# Altium PCB Board3ph.PcbDoc (part 4 of 4)
Units mil, origin at the board's own origin, x right, y up, seen from the top; angles counter-clockwise.
Board outline 2522.05 x 3126.78 mil, 4 copper layers (Top Layer, Mid Layer, Mid Layer 2, Bottom Layer), stack 61.653 mil thick; 132 components, 105 nets, 468 pads, 161 vias.
Unrouted connection lines stored in the file: 3.
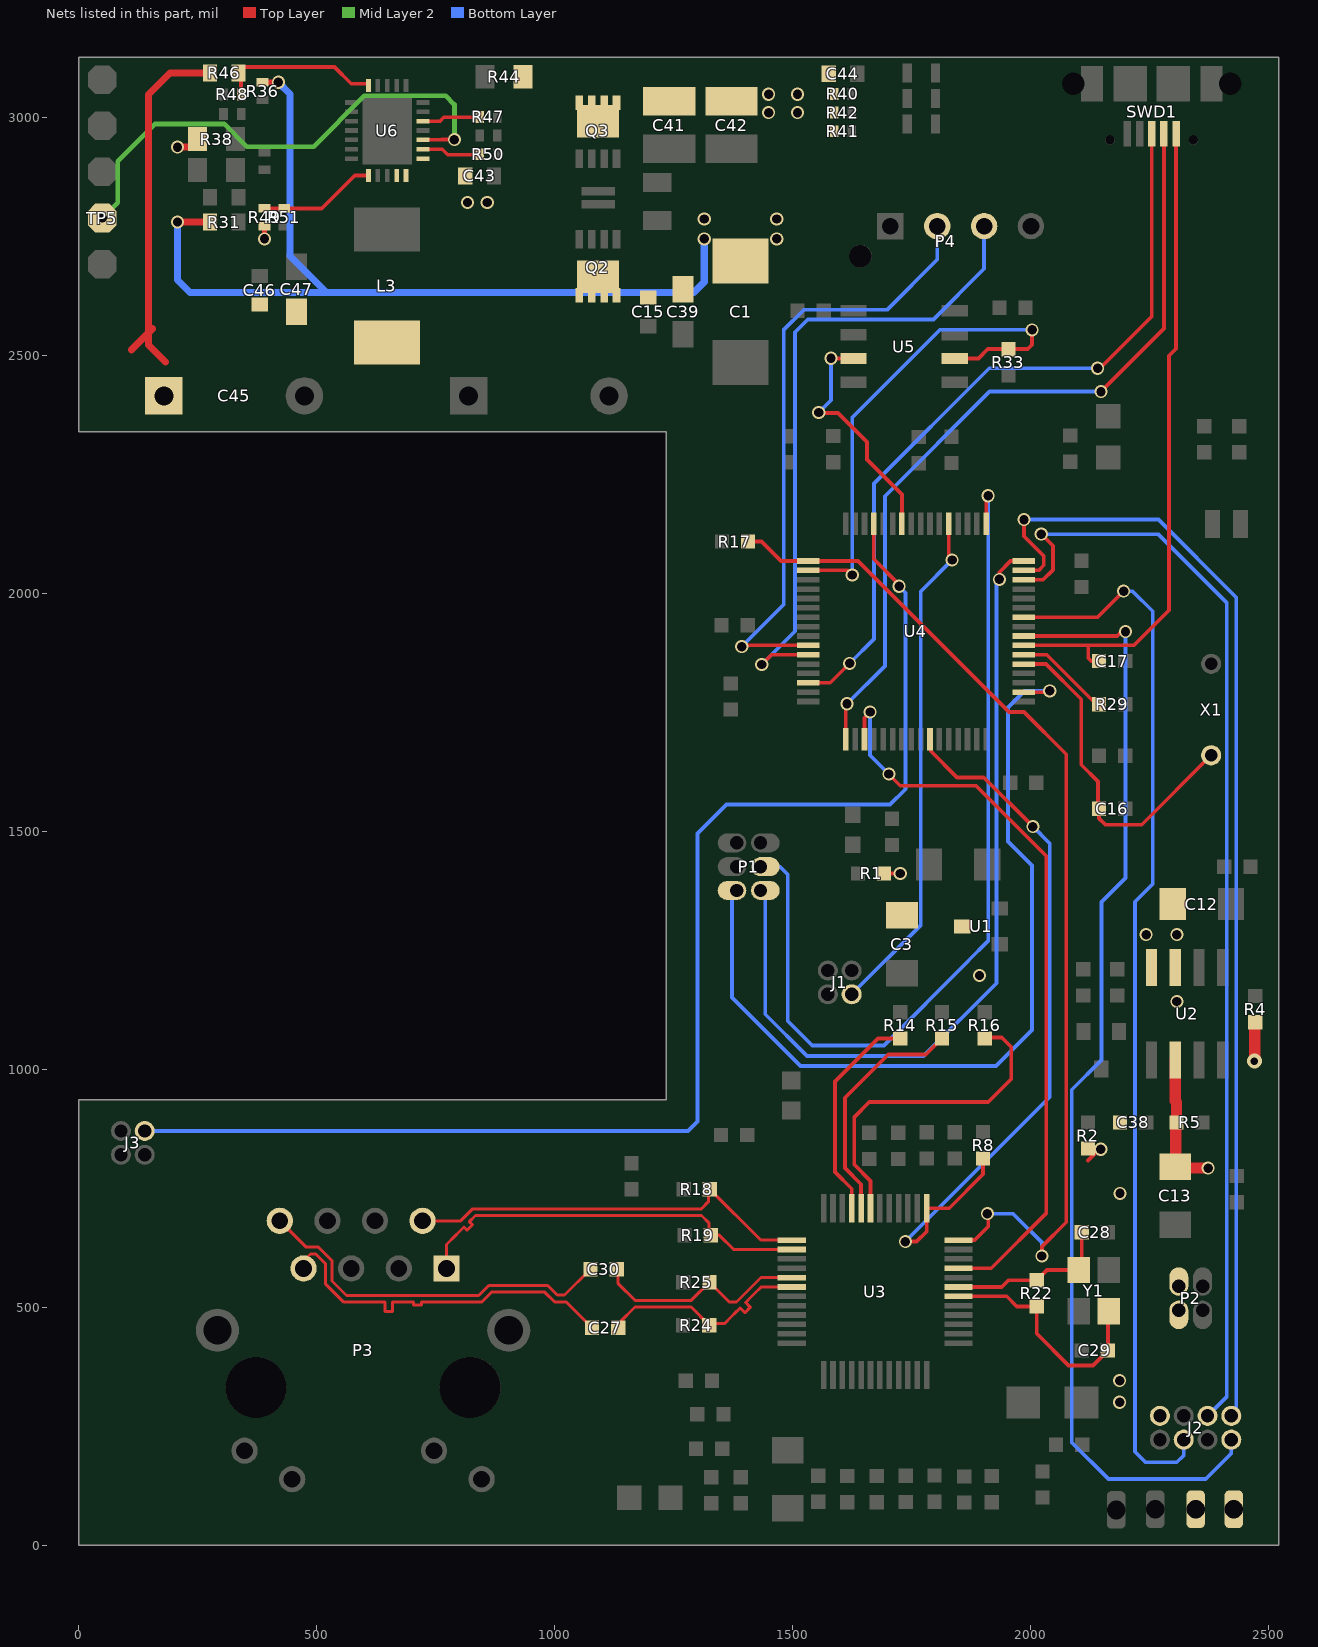
[diagram p5: the nets of this part, all layers, seen from the top]

## Via types
v1: diameter 27.56, hole 19.68, Top Layer to Bottom Layer, 151 vias
v2: diameter 23.62, hole 11.81, Top Layer to Bottom Layer, 6 vias
v3: diameter 27.56, hole 19.68, Top Layer to Bottom Layer, tented both sides, 2 vias
v4: diameter 21.65, hole 11.81, Top Layer to Bottom Layer, 1 vias
v5: diameter 31.5, hole 15.75, Top Layer to Bottom Layer, 1 vias

## Nets (pads, with @x,y where several pads share a name; then routed paths per layer and width w, separated by ;. In a path a pad name is that pad's centre, name@x,y a point inside that pad or via, vN(x,y) a via of type N, cw(c..) or ccw(c..) an arc to the next point about the centre after c; other vN are vias at no path point) (continued)
NetR46_1: R46.1 R48.2 U6.12 | length 347.6
  Top Layer w8: R48.2@341.5,3048.36 341.5,3088 R46.1@336,3093.5 336,3094.92 347,3105.92 537.61,3105.92 572.87,3070.67 609.25,3070.67 U6.12@609.25,3077
NetR47_2: R47.2 U6.5 | length 123
  Top Layer w7.87: U6.5@723.42,2992.2 759.3,2992.2 767.43,3000.32 841.66,3000.32 R47.2@842.66,3001.32
NetR49_2: R49.2 R51.1 U6.20 | length 247.2
  Top Layer w8: R49.2@390.71,2808.79 R51.1@432.24,2808.79 511.08,2808.79 580.31,2878.02 U6.20@609.25,2878.02
NetR50_2: R50.2 U6.2 | length 126.1
  Top Layer w7.87: U6.2@723.42,2933.14 764.29,2933.14 775.8,2921.63 837.6,2921.63 R50.2@842.66,2926.69
NetSWD1_2: SWD1.2 U4.49 | length 1676.7
  Top Layer w7.87: U4.49@1611.81,1694.09 v1@1611.81,1760.63 ; v1(2148.04,2424.02) 2280.32,2556.3 SWD1.2@2280.32,2965.55
  Bottom Layer w7.87: v1(1614.57,1768.11) 1694.09,1847.64 1694.09,2203.94 1914.17,2424.02 v1(2148.04,2424.02)
NetSWD1_3: SWD1.3 U4.46 | length 1616.4
  Top Layer w7.87: U4.46@1533.07,1812.2 1579.13,1812.2 v1(1620.08,1853.15) ; v1(2140.94,2473) 2141.94,2472 2144.84,2472 2254.73,2581.89 SWD1.3@2254.73,2965.55
  Bottom Layer w7.87: v1(1620.08,1853.15) 1671.26,1904.33 1671.26,2231.1 1913.16,2473 v1(2140.94,2473)
NetTP5_1: TP5.1 U6.3 | length 1110.1
  Top Layer w7.87: U6.3@723.42,2952.83 723.75,2953.16 789.39,2953.16 v1(789.73,2953.49) 763.86,2953.49
  Mid Layer 2 w10: v1(50,2788.69) 82.35,2821.05 82.35,2907.81 160.87,2986.33 305.67,2986.33 353.47,2938.53 493.73,2938.53 600.56,3045.36 771.53,3045.36 789.73,3027.17 v1(789.73,2953.49)
OE: J2.6 U4.10 | length 2249.2
  Top Layer w7.87: U4.10@1985.82,1950 2140.94,1950 v1(2195.67,2004.72) v1@2195.67,1998.82
  Bottom Layer w7.87: v1(2195.67,2004.72) 2214.57,2004.72 2256.69,1962.6 2256.69,1389.6 2219.38,1352.28 2219.38,1292.85 2219.38,1273.28 2219.38,196.76 2241.73,174.41 2307.48,174.41 2321.97,188.9 J2.6@2321.97,222.09
PH0-OSC_IN: C16.2 U4.5 X1.2 | length 720
  Top Layer w7.87: U4.5@1985.82,1851.57 2032.68,1851.57 2106.69,1777.56 2106.69,1640.16 2141.73,1605.12 2141.73,1547.64 C16.2@2144.09,1547.64 2144.09,1527.41 2157.57,1513.94 2233.62,1513.94 X1.2@2379.53,1659.84
PH1-OSC_OUT: R29.1 U4.6 | length 195.5
  Top Layer w7.87: U4.6@1985.82,1871.26 2034.37,1871.26 R29.1@2138.31,1767.32
PIO0_7/INT_N: R17.1 U3.36 U4.33 | length 2199.2
  Top Layer w7.87: R17.1@1406.69,2109.06 1435.04,2109.06 1475.98,2068.11 U4.33@1533.07,2068.11 1637.46,2068.11 1954.78,1750.79 1986.44,1750.79 2075,1662.22 2075,678.94 2024.02,627.95 v1(2024.02,607.87) ; U3.36@1848.82,641.34 1883.07,641.34 1911.42,669.68 1911.42,694.88 v1(1909.45,696.85)
  Bottom Layer w7.87: v1(1909.45,696.85) 1963.39,696.85 2024.02,636.22 v1(2024.02,607.87)
PM0: J2.3 U4.14 | length 2329.6
  Top Layer w7.87: U4.14@1985.82,2028.74 2026.33,2028.74 2047.09,2049.51 2047.09,2100.1 v1(2022.63,2124.56)
  Bottom Layer w7.87: v1(2022.63,2124.56) 2267.96,2124.56 2412.6,1979.92 2412.6,312.72 J2.3@2371.97,272.09
PM1: J2.1 U4.15 | length 2397.2
  Top Layer w7.87: U4.15@1985.82,2048.42 2017.32,2048.42 2028.07,2059.17 2028.07,2078.54 1986.44,2120.16 v1(1986.44,2155.11)
  Bottom Layer w7.87: v1(1986.44,2155.11) 2268.7,2155.11 2432.28,1991.53 2432.28,1961.2 2432.28,282.4 J2.1@2421.97,272.09
PMODE0: R14.1 U3.45 | length 455.2
  Top Layer w7.87: U3.45@1624.41,708.27 1624.41,749.35 1589.37,784.39 1589.37,974.41 1679.92,1064.96 R14.1@1726.38,1064.96
PMODE1: R15.1 U3.44 | length 503.5
  Top Layer w7.87: U3.44@1644.09,708.27 1644.09,758.74 1610.12,792.71 1610.12,940.44 1701.18,1031.49 1780.12,1031.49 1814.17,1065.55 R15.1@1814.17,1066.93
POMDE2: R16.1 U3.43 | length 702.3
  Top Layer w7.87: U3.43@1663.78,708.27 1663.78,765.65 1629.96,799.46 1629.96,900.19 1661.26,931.49 1911.42,931.49 1959.45,979.53 1959.45,1047.24 1939.76,1066.93 1905.9,1066.93 R16.1@1904.23,1065.25 ; R16.1@1903.94,1064.96 R16.1@1904.23,1065.25 ; R16.1@1903.94,1066.93 1903.94,1065.55 R16.1@1904.23,1065.25
RESET: J3.4 U4.29 | length 2836
  Top Layer w7.87: U4.29@1670.86,2146.85 1670.86,2072.05 1724.02,2018.9 v1(1724.02,2014.96)
  Bottom Layer w7.87: J3.4@139.06,870.63 1280.55,870.63 1300.63,890.71 1300.63,1495.71 1361.22,1556.3 1705.12,1556.3 1737.4,1588.58 1737.4,2001.57 v1(1724.02,2014.96)
RI: P1.2 U4.2 | length 1806.7
  Top Layer w7.87: U4.2@1985.82,1792.52 2037.8,1792.52 v1(2040.55,1795.27)
  Bottom Layer w7.87: P1.2@1382.87,1375.91 1372.87,1365.91 1372.87,1151.14 1516.93,1007.09 1927.56,1007.09 2003.15,1082.68 2003.15,1428.45 1952.89,1478.71 1952.89,1760.52 1987.64,1795.27 v1(2040.55,1795.27)
RLY1: J2.2 U4.8 | length 2390
  Top Layer w7.87: U4.8@1985.82,1910.63 2182.28,1910.63 2191.33,1919.68 v1(2199.6,1919.68)
  Mid Layer 2 w7.87: v1@2195.67,1919.68 v1(2199.6,1919.68)
  Bottom Layer w7.87: v1(2199.6,1919.68) 2199.6,1401.94 2149.23,1351.56 2149.23,1019.94 2086.65,957.36 2086.65,216.35 2163.63,139.37 2368.11,139.37 2421.97,193.23 J2.2@2421.97,222.09
RST: C17.2 SWD1.1 U4.7 | length 1395
  Top Layer w7.87: U4.7@1985.82,1890.94 2121.26,1890.94 ; C17.2@2144.09,1857.87 2127.56,1857.87 2121.26,1864.17 2121.26,1890.94 ; SWD1.1@2305.91,2965.55 2305.91,2514.24 2291.14,2499.47 2291.14,1964.76 2217.33,1890.94 2121.26,1890.94
RX2_N: C30.1 P3.R8 | length 782.5
  Top Layer w6.3: P3.R8@422.83,681.89 478.35,626.38 504.3,626.38 532.68,598 532.68,555.51 563.21,524.98 840.77,524.98 861.85,546.06 985.63,546.06 1005.91,525.79 1021.18,525.79 C30.1@1075.71,580.32
RX2_P: C27.1 P3.R7 | length 784.7
  Top Layer w6.3: P3.R7@472.83,581.89 472.83,597.64 487.4,612.2 498.43,612.2 518.5,592.13 518.5,549.64 553.18,514.96 557.34,510.81 573.62,510.81 619.68,510.81 627.76,510.81 643.9,510.81 643.9,491.12 660.04,491.12 660.04,510.81 676.18,510.81 679.92,510.81 687.99,510.81 704.13,510.81 704.13,505.33 720.28,505.33 720.28,510.81 735.43,510.81 846.64,510.81 850.79,514.96 867.72,531.89 979.76,531.89 1000.03,511.61 1024.33,511.61 C27.1@1078.86,457.09
RX_DEBG: P4.3 U4.43 | length 1387
  Top Layer w7.87: v1(1435.43,1850.79) 1455.91,1871.26 U4.43@1533.07,1871.26
  Bottom Layer w7.87: v1(1435.43,1850.79) 1505.07,1920.42 1505.07,2548.6 1532.13,2575.66 1796.04,2575.66 1902.51,2682.12 P4.3@1902.51,2783.65
RX_N: C30.2 R25.2 U3.5 | length 465.1
  Top Layer w6.3: C30.2@1130.71,580.32 1133.86,577.17 1133.86,549.8 1168.9,514.76 1287.48,514.76 R25.2@1325.47,552.76 1367.03,511.2 1382.5,511.2 1433.9,562.6 U3.5@1498.42,562.6
RX_P: C27.2 R24.2 U3.6 | length 464.4
  Top Layer w6.3: C27.2@1133.86,457.09 1137.01,460.24 1137.01,468.7 1168.9,500.59 1287.09,500.59 R24.2@1325.08,462.6 1328.23,465.75 1357.09,465.75 1373.03,481.69 1378.74,487.4 1390.15,498.81 1399.99,488.98 1411.4,500.39 1401.57,510.23 1412.98,521.64 1419.29,527.95 1434.25,542.91 U3.6@1498.42,542.91
RX_UC: P1.3 U4.17 | length 1900.4
  Top Layer w7.87: U4.17@1907.08,2146.85 1907.08,2201.18 v1(1911.02,2205.12)
  Bottom Layer w7.87: P1.3@1432.87,1425.91 1473.7,1425.91 1490.16,1409.45 1490.16,1101.57 1541.34,1050.39 1692.12,1050.39 1869.29,1227.56 1869.29,1228.23 1911.02,1269.96 v1(1911.02,2205.12)
SCAP: C45.1 C46.2 C47.1 L3.2 R46.2 U6.23 | length 787.3
  Top Layer w15: 111,2512 146.67,2547.67 ; 155,2556 146.67,2547.67 ; 182.5,2485.94 146.67,2521.77 146.67,2547.67 ; R46.2@276,3093.5 192.08,3093.5 146.67,3048.09 146.67,2547.67
SCLK: J1.3 U4.21 | length 1079.4
  Top Layer w7.87: U4.21@1828.34,2146.85 1828.34,2077.25 v1(1835.28,2070.32)
  Bottom Layer w7.87: J1.3@1624.25,1157.76 1769.69,1303.19 1769.69,2004.72 v1(1835.28,2070.32)
SCLK_EE: R33.1 U4.34 U5.6 | length 1087.5
  Top Layer w7.87: U4.34@1533.07,2048.42 1615.75,2048.42 v1(1625.59,2038.58) ; U5.6@1840.67,2493.7 1890.53,2493.7 1910.1,2513.27 R33.1@1953.66,2513.27 1994.06,2513.27 2003.34,2522.56 v1(2003.34,2553.72)
  Bottom Layer w7.87: v1(1625.59,2038.58) 1625.59,2369.8 1809.51,2553.72 v1(2003.34,2553.72)
SCLK_ETH: U3.33 U4.51 | length 1593.2
  Top Layer w7.87: U4.51@1651.18,1694.09 1651.18,1738.97 v1(1662.99,1750.79) ; v1(1702.36,1620.47) 1702.36,1620.08 1726.38,1596.06 1885.69,1596.06 2032.88,1448.87 2032.88,697.44 1917.71,582.28 U3.33@1848.82,582.28
  Bottom Layer w7.87: v1(1662.99,1750.79) 1662.99,1659.84 v1(1702.36,1620.47)
TX_DEBG: P4.2 U4.42 | length 1308.7
  Top Layer w7.87: v1(1393.31,1888.19) 1396.06,1890.94 U4.42@1533.07,1890.94
  Bottom Layer w7.87: v1(1393.31,1888.19) 1481.39,1976.27 1481.39,2553.31 1523.81,2595.74 1698.29,2595.74 1804.08,2701.52 P4.2@1804.08,2783.65
TX_N: P3.R2 R18.1 U3.1 | length 861.3
  Top Layer w6.3: P3.R2@722.83,681.89 802.79,681.89 827.99,707.09 1308.66,707.09 1323.23,721.65 1323.23,745.28 R18.1@1326.38,748.43 1433.46,641.34 U3.1@1498.42,641.34
TX_P: P3.R1 R19.1 U3.2 | length 861.3
  Top Layer w6.3: P3.R1@772.83,581.89 772.83,631.89 792.52,651.57 798.23,657.28 809.64,668.7 816.08,662.26 827.49,673.67 821.05,680.11 833.86,692.91 1308.66,692.91 1325.08,676.5 1325.08,654.72 R19.1@1328.23,651.57 1346.38,651.57 1376.3,621.65 U3.2@1498.42,621.65
TX_UC: P1.1 U4.16 | length 1776.7
  Top Layer w7.87: v1(1934.65,2029.53) 1934.65,2044.49 1958.27,2068.11 U4.16@1985.82,2068.11
  Bottom Layer w7.87: P1.1@1432.87,1375.91 1442.87,1365.91 1442.87,1115.79 1530.71,1027.95 1775.53,1027.95 1928.74,1181.16 1928.74,2023.62 v1(1934.65,2029.53)
VBAT: C13.2 P2.1 P2.2 pad.1 R4.1 R5.2 U2.6 | length 379
  Top Layer w23.62: U2.6@2304.13,1019.49 2304.13,933.97 2306.61,931.49 R5.2@2306.61,888.58 2305.37,887.34 2305.37,796.91 C13.2@2304.13,795.67 2306.95,792.85 2372.9,792.85 v1(2373.23,792.52) ; v5(2470.36,1017.32) 2471.4,1018.36 2471.4,1098.17 R4.1@2472.44,1099.21
VCC=5V: C1.1 C15.2 C38.1 C39.1 J2.7 pad.2 Q2.5 Q2.6 Q2.7 Q2.8 Q2.9 R1.1 R31.2 R36.2 U2.4 | length 1957.7
  Top Layer w7.87: R1.1@1692.46,1411.65 v1(1726.38,1411.65)
  Top Layer w12: R36.2@386.71,3074 v1(419.74,3074)
  Top Layer w15: v1(208,2780.29) R31.2@276,2780.29
  Bottom Layer w15: v1(208,2780.29) 208,2658.41 234.08,2632.33 521.24,2632.33 ; v1(419.74,3074) 444.57,3049.17 444.57,2709 521.24,2632.33 ; v1(1314.57,2745) 1314.57,2654.35 1292.55,2632.33 521.24,2632.33
  other v1: 2187.3,300.7 2187.3,346.06 2188.19,739.53 2243,1283.07 1467,2745 1314.57,2786.65 1467,2786.65
VSYS-5V: C3.1 C12.2 C41.2 C42.2 C43.2 C44.2 Q3.5 Q3.6 Q3.7 Q3.8 Q3.9 R2.2 R38.2 R40.2 R41.2 R42.2 R44.2 R49.1 U1.3 U2.3 U6.1 U6.24 | length 105.6
  Top Layer w7.87: 2120.76,808.38 2144.69,832.32 v1(2147.67,832.32)
  Top Layer w10: v1(390.71,2745) R49.1@390.71,2771.79
  Top Layer w15: v1(208,2937.67) R38.2@250,2937.67
  other v1: 1892.91,1197.24 817.08,2821.29 858.73,2821.29 1449.84,3010.13 1510.41,3010.13 1449.84,3048.74 1510.41,3048.74
  other v3: 2307.47,1142.52 2307.47,1283.07
W5500_RST: R8.1 U3.37 U4.58 | length 1602.6
  Top Layer w7.87: v1(1737.01,638.19) 1760.63,638.19 1781.89,659.45 U3.37@1781.89,708.27 1829.14,708.27 1900.39,779.53 R8.1@1900.39,812.99 ; U4.58@1788.97,1694.09 1790.94,1692.13 1790.94,1668.36 1845.92,1613.39 1901.77,1613.39 v1(2005.02,1510.14)
  Bottom Layer w7.87: v1(1737.01,638.19) 2040.55,941.73 2040.55,1474.61 v1(2005.02,1510.14)
W_EE: U4.26 U5.3 | length 500.6
  Top Layer w7.87: v1(1555.2,2380.1) 1556.06,2379.24 1595.67,2379.24 1656.57,2318.34 1656.57,2281.41 1729.92,2208.06 U4.26@1729.92,2146.85 ; v1(1581,2494) 1581.3,2493.7 U5.3@1628.07,2493.7
  Bottom Layer w7.87: v1(1555.2,2380.1) 1581,2405.9 v1(1581,2494)
XI: C29.2 R22.2 U3.30 Y1.3 | length 503.7
  Top Layer w7.87: U3.30@1848.82,523.23 1950,523.23 1971.14,502.09 R22.2@2013.39,502.09 2013.39,444.49 2079.92,377.95 2131.1,377.95 C29.2@2162.6,409.45 2162.6,490.15 Y1.3@2164.18,491.73
XO: C28.2 R22.1 U3.31 Y1.1 | length 349.2
  Top Layer w7.87: U3.31@1848.82,542.91 1939.76,542.91 1953.94,557.09 R22.1@2013.39,557.09 2034.65,578.35 Y1.1@2101.18,578.35 2107.48,584.65 C28.2@2107.48,657.87
pads on no net: J3.2 J3.3 P3. P3.R4 P3.R5 P3.R6 P4.5 SWD1.6 SWD1.7 SWD1.8 SWD1.9 SWD1.None U2.5 U3.7 U3.12 U3.13 U3.18 U3.24 U3.26 U3.46 U3.47 U4.25 U4.27 U4.30 U4.39 U4.44 U4.45 U4.50 U4.54 U4.55 U4.59 U4.61

## Polygon pours and split planes (outlines as drawn)
GND on Mid Layer "Mid Layer-GND" (solid, pour order 6): 2485,2712.99 2485,3108 23,3108 23,2363 1268.74,2363 1261.28,31.5 2485,31.5
NetC45_2 on Mid Layer 2 "NETC45_2_L03_P052" (solid, pour order 52): 121.56,2354 1075.24,2354 1075.27,2353.98 1075.27,3112 679.77,3112 679.77,3067.82 885.91,3067.82 919,3034.72 919,2691.95 121.56,2691.95
VSYS-5V on Mid Layer 2 "VSYS-5V_L03_P051" (solid, pour order 51): 183.63,2954.97 121.56,2892.9 121.56,2722 174.12,2722 174.25,2722.13 259.13,2722.13 259,2722 884.56,2722 885.91,2720.66 885.91,2859 324,2859 324,2904.2 273.23,2954.97
VSYS-5V on Mid Layer 2 "VSYS-5V_L03_P040" (solid, remove dead copper, pour order 40): 1108.68,2824.61 2291.14,2824.61 2291.14,1226.95 1873.21,1226.95 1873.21,1030.31 2086.62,1030.31 2086.62,811 2271.18,811 2271.18,1055 2494,1055 2494,3112 1108.68,3112
+3V3 on Mid Layer 2 "Mid Layer 2-+3.3V" (solid, pour order 14): 2001,181 2075.9,106.1 2210.63,106.1 2210.63,34.65 1739,34.65 1739,431.91 1264.12,906.79 1264.14,2383.46 2028.41,2383.46 2028.41,1505.53 1624.25,1505.53 1624.25,906.84 2001,530.09
VCC=5V on Mid Layer 2 "VCC=5V_L03_P041" (solid, remove dead copper, pour order 41): 2271.97,293.7 2291.14,293.7 2291.14,251.24 2251.21,251.24 2242.91,242.94 2242.91,190.14 2373.23,190.14 2373.23,38.97 2318.27,38.97 2318.27,128 2088,128 2024.02,191.98 2024.02,526.98 1638.62,912.38 1638.62,1492.76 2040.11,1492.76 2040.11,2415 1108,2415 1108,2809.08 2277,2809.08 2277,1240 1863.78,1240 1863.78,1017.32 2074.02,1017.32 2074.02,802 2271.97,802
VBAT on Mid Layer 2 "VBAT_L03_P021" (solid, pour order 21): 2495.28,464.1 2495.28,38 2406,38 2406,174.21 2452,174.21 2452,323 2285.43,323 2285.43,1043 2495.28,1043
+3V3A on Mid Layer 2 "Mid Layer 2-+3V3A" (solid, pour order 10): 1387.14,763 1726.16,423.99 1726.16,34.65 1200,34.65 1200,763
VSYS-5V on Top Layer "VSYS-5V_L01_P045" (solid, pour order 45): 1025.75,2957.75 1025.75,3016.71 981.96,3060.5 894.16,3060.5 894.16,3116.84 1596.4,3116.84 1596.4,2992.2 1169.6,2992.2 1135.15,2957.75
VSYS-5V on Top Layer "VSYS-5V_L01_P042" (solid, pour order 42): 827.71,2895.12 827.71,2849.77 841.54,2835.94 879.66,2835.94 879.66,2793 789.73,2793 789.73,2826.62 752.1,2864.24 683.07,2864.24 683.07,2891.8 706.31,2891.8 709.64,2895.12 709.64,2918.38 737.2,2918.38 760.45,2895.12
SCAP on Top Layer "SCAP_L01_P038" (solid, pour order 38): 658.92,2629.13 727.11,2629.13 735.26,2637.29 735.26,2808.37 726.09,2817.54 686.09,2817.54 660.22,2843.41 660.22,2894.71 677.36,2894.71 677.36,2861.2 681.06,2857.5 748.87,2857.5 779.99,2826.38 779.99,2788.13 779.99,2480.55 658.92,2480.55
NetL3_1 on Top Layer "NETL3_1_L01_P039" (solid, pour order 39): 615.13,2856 591.94,2856 527,2791.06 527,2691.79 724.4,2691.79 724.4,2811.07 681.41,2811.07 653.54,2838.94 653.54,2894.8 624.01,2894.8 624.01,2864.88
VCC=5V on Top Layer "VCC=5V_L01_P020" (solid, pour order 20): 2170.01,367 2170.01,263.72 2181.73,252 2295,252 2295,295.94 2311.26,312.2 2447.55,312.2 2462.09,297.66 2462.09,200 2447.4,185.31 2321.97,185.31 2306.61,169.96 2306.61,33.05 2371.97,33.05 2371.97,139.97 2488,139.97 2506,157.97 2506,336.12 2475.12,367
GND on Top Layer "Mid Layer-GND" (solid, remove dead copper, pour order 49): 2485,2712.99 2485,3116.84 35,3116.84 35,2353.37 1264.74,2353.37 1257.32,31.5 2480.31,31.5 2480.32,2712.99
GND on Top Layer "GND_L01_P046" (solid, pour order 46): 2496.85,734.65 2398.24,734.65 2266,734.65 2266,913.78 2217.33,913.78 2217.33,734.65 2217.33,676.5 2139.16,676.5 2137.8,544.1 2238.5,543.78 2238.5,607.87 2334.57,607.87 2340.81,601.63 2340.81,409.45 2496.85,409.45
VSYS-5V on Top Layer "VSYS-5V_L01_P048" (solid, remove dead copper, pour order 48): 1694.09,1353.29 1694.09,1262.99 1782.28,1262.99 1782.28,1177.56 1907.08,1177.56 1907.08,1315.39 1763.38,1315.39 1763.38,1353.29
VSYS-5V on Top Layer "VSYS-5V_L01_P047" (solid, remove dead copper, pour order 47): 2327,1380.41 2327,1119.96 2274,1119.96 2274,1380.41
VSYS-5V on Bottom Layer "VSYS-5V_L04_P050" (solid, pour order 50): 952.31,2864 951.66,2997.78 1019.46,3065.58 1555.2,3065.58 1555.2,2995 1108.89,2995 1062.69,2948.79 1062.69,2815.83 1038.86,2792 763,2792 763,2864
GND on Bottom Layer "Mid Layer-GND" (solid, remove dead copper, pour order 43): 2485,2712.99 2485,3117 25,3117 25,2354 1264.41,2354 1256.98,31.5 2480.31,31.5 2480.32,2712.99

## Other copper
Top Layer:
  rectangle net VSYS-5V: 1578.4,2958.43 1596.4,3116.58
  rectangle net NetC45_2: 283,2353.37 911.41,2469.66
  rectangle net SCAP: 95,2353.37 270,2629.13
  rectangle net SCAP: 95,2480.55 779.99,2629.13
  region net NetQ3_1: 1158.65,2882.43 1025.42,2882.43 1025.42,2836.02 1158.65,2836.02
  rectangle net NetQ3_1: 1025.42,2836.02 1112.27,2945.35
  rectangle net NetC40_2: 1025.75,2774.98 1245.83,2826.26
  rectangle net NetC40_2: 1070.34,2724 1245.83,2826.26
  rectangle net VCC=5V: 1025.75,2599.97 1449.84,2699.51
  rectangle net VCC=5V: 1331.73,2606.6 1449.84,2745.14
  rectangle net VCC=5V: 1291.19,2720.7 1484.85,2804
  rectangle net +3V3: 1961.66,1761.68 2021.98,1778.43
  rectangle net GND: 1218.11,31.5 1307.32,124.76
  rectangle net VCC=5V: 2170.18,721.07 2205.09,913.78
  rectangle net VSYS-5V: 2096.31,799.31 2160.24,851.93
  rectangle net VCC=5V: 2217.33,1175.56 2266,1300.39
  pour cut-out: 501.94,2842.16 501.94,2796.81 530.96,2796.81 530.96,2842.01 530.81,2842.16
  pour cut-out: 291.35,3115.7 291.35,3070.35 320.37,3070.35 320.37,3115.55 320.22,3115.7
  pour cut-out: 351.22,2802.79 351.22,2757.44 408.7,2757.44 408.7,2802.79
  pour cut-out: 1596.4,3067.74 1596.4,2952.52 1786.13,2952.52 1786.13,3067.74
  pour cut-out: 1147.6,2967.04 1147.6,2882.8 1176.62,2882.8 1176.62,2967.04
  pour cut-out: 971.66,2807.25 971.66,2680.94 1019.36,2680.94 1019.36,2807.25
  pour cut-out: 1291.19,2810 1245.83,2810 1245.83,2780.98 1291.04,2780.98 1291.19,2781.13
  pour cut-out: 1019.36,2798.69 982.03,2798.69 941.52,2839.2 941.52,2987.35 911.41,3017.46 857.56,3017.46 857.56,3055.35 981.5,3055.35 1019.36,3017.49
Mid Layer 2:
  region net VCC=5V: 2161.02,293.7 2286.22,293.7 2286.22,255.91 2284.65,254.33 2161.02,254.33
Bottom Layer:
  rectangle net VCC=5V: 1291.2,2720.77 1484.93,2804.06

## Silkscreen, mask and mechanical layers (free items; w line width, h text height)
Top Overlay:
  circle w7.87: c2266.43,838.97 r3.94
  circle w7.87: c2487.29,838.97 r3.94
  circle w7.87: c2064.57,623.62 r3.94
  lines w1: 2492.57,2284.56 2492.57,2367.56
  lines w5: 12.11,2643.96 215.38,2643.96 215.38,2543.89 115.43,2543.89 115.43,2451.43 96.5,2451.43 ; 218.73,2618.89 258,2618.89 258,2745 ; 229.36,2841.55 229.36,2745 365,2745 365,3114.32 ; 390.71,2821.29 390.71,2839.31 482.74,2839.31 482.74,2853 ; 407.71,2527.6 420.24,2527.6 420.24,2575.13 ; 793.71,2856.03 793.71,2841.55 901.68,2841.55 ; 830.16,3017.32 830.16,3032.36 901.68,3032.36 901.68,2856.03 901.68,2691.79 ; 834.48,2513.81 834.48,2691.79 901.68,2691.79 ; 940,2515 940,2691.79 901.68,2691.79 ; 2097,2742 2467.85,2742 2467.85,2810.72 2097,2810.72 2097,2742
  lines w10: 2145.07,30.94 2151.25,24.76 2485.19,24.76 2493.06,32.64 2493.06,123.19 2485.19,131.06 2155.19,131.06 2145.07,120.94 2145.07,30.94
  text "CAP-GD" at 1850.99,3076.95 h35
  text "CAP-GD" at 87,3062.77 h35
  text "SYS-GD" at 1848.47,3023.38 h35
  text "PFO" at 1848.47,2969.8 h35
  text "SYS-GD" at 87,2965.87 h35
  text "PFO" at 87,2868.97 h35
  text "IMON" at 87,2772.06 h35
  text "+3V3" at 2115.59,2761 h27.56
  text "TX" at 2239.79,2761 h27.56
  text "RX" at 2308.9,2761 h27.56
  text "GND" at 2379.53,2761 h27.56
  text "CAPFLT" at 87,2675.18 h35
  text "+" at 1750.12,1375.91 h27.56
  text "+" at 1671.26,1283.07 h27.56
  text "+5V" at 2394.88,53.94 h19.68 r90
  text "GND" at 2314.57,52.76 h19.68 r90
  text "VBAT" at 2480.07,40.94 h19.68 r90
  text "+3.3V" at 2232.68,32.28 h19.68 r90
Mechanical 1:
  the board outline again, w10
Mechanical 3:
  drawing of 295 lines, arcs and shapes, not listed
  text "Layer" at 2927.58,1418 h60
  text "Name" at 3337.49,1418 h60
  text "Material" at 4267.23,1418 h60
  text "Thickness" at 5127,1418 h60
  text "Constant" at 5776.84,1418 h60
  text "Board Layer Stack" at 6346.7,1418 h60
  text "Top Overlay" at 3337.49,1298 h60
  text "Top Solder" at 3337.49,1178 h60
  text "Solder Resist" at 4267.23,1178 h60
  text "0.010mm" at 5127,1178 h60
  text "3.5" at 5776.84,1178 h60
  text "1" at 2927.58,1058 h60
  text "Top Layer" at 3337.49,1058 h60
  text "0.035mm" at 5127,1058 h60
  text "Dielectric 1" at 3337.49,938 h60
  text "FR-4" at 4267.23,938 h60
  text "0.203mm" at 5127,938 h60
  text "4.2" at 5776.84,938 h60
  text "2" at 2927.58,818 h60
  text "Mid Layer" at 3337.49,818 h60
  text "0.030mm" at 5127,818 h60
  text "Dielectric 3" at 3337.49,698 h60
  text "1.030mm" at 5127,698 h60
  text "4.2" at 5776.84,698 h60
  text "3" at 2927.58,578 h60
  text "Mid Layer 2" at 3337.49,578 h60
  text "0.030mm" at 5127,578 h60
  text "Dielectric 2" at 3337.49,458 h60
  text "0.203mm" at 5127,458 h60
  text "4.2" at 5776.84,458 h60
  text "4" at 2927.58,338 h60
  text "Bottom Layer" at 3337.49,338 h60
  text "0.035mm" at 5127,338 h60
  text "Bottom Solder" at 3337.49,218 h60
  text "Solder Resist" at 4267.23,218 h60
  text "0.010mm" at 5127,218 h60
  text "3.5" at 5776.84,218 h60
  text "Bottom Overlay" at 3337.49,98 h60
  text "Total board thickness:" at 2927.58,-22 h60
  text "1.586mm" at 5127,-22 h60
Mechanical 4:
  circle w7.87: c2069.97,1163.78 r3.94
  circle w7.87: c2069.97,1163.78 r3.94
  circle w7.87: c2480.71,2188.58 r3.94
  circle w7.87: c2480.71,2188.58 r3.94
  circle w7.87: c2391.23,829.92 r3.94
  circle w7.87: c2391.23,829.92 r3.94
  circle w7.87: c2089.37,1164.57 r3.94
Board Outline:
  the board outline again, w10
Drill Drawing:
  drawing of 191 lines, arcs and shapes, not listed
  text "Symbol" at 3014.5,4224.94 h72
  text "Count" at 3520.38,4224.94 h72
  text "Hole Size" at 4120.22,4224.94 h72
  text "Plated" at 5269.88,4224.94 h72
  text "Hole Type" at 5775.76,4224.94 h72
  text "Drill Layer Pair" at 6509.56,4224.94 h72
  text "Via/Pad" at 8009.11,4224.94 h72
  text "Pad Shape" at 8598.96,4224.94 h72
  text "Template" at 9688.64,4224.94 h72
  text "Description" at 10678.36,4224.94 h72
  text "Hole Tolerance (+)" at 11532.12,4224.94 h72
  text "Hole Tolerance (-)" at 12865.73,4224.94 h72
  text "Hole Length" at 14199.33,4224.94 h72
  text "Routed Path Length" at 15289.02,4224.94 h72
  text "1" at 3520.38,4074.94 h60
  text "15.75mil (0.400mm)" at 4120.22,4074.94 h60
  text "PTH" at 5269.88,4074.94 h60
  text "Round" at 5775.76,4074.94 h60
  text "Top Layer - Bottom Layer" at 6509.56,4074.94 h60
  text "Via" at 8009.11,4074.94 h60
  text "Rounded" at 8598.96,4074.94 h60
  text "v80h40" at 9688.64,4074.94 h60
  text "-" at 14199.33,4074.94 h60
  text "-" at 15289.02,4074.94 h60
  text "1" at 3520.38,3924.94 h60
  text "47.00mil (1.194mm)" at 4120.22,3924.94 h60
  text "NPTH" at 5269.88,3924.94 h60
  text "Round" at 5775.76,3924.94 h60
  text "Top Layer - Bottom Layer" at 6509.56,3924.94 h60
  text "Pad" at 8009.11,3924.94 h60
  text "Rounded" at 8598.96,3924.94 h60
  text "c120hn119m135" at 9688.64,3924.94 h60
  text "-" at 14199.33,3924.94 h60
  text "-" at 15289.02,3924.94 h60
  text "2" at 3520.38,3774.94 h60
  text "19.69mil (0.500mm)" at 4120.22,3774.94 h60
  text "NPTH" at 5269.88,3774.94 h60
  text "Round" at 5775.76,3774.94 h60
  text "Top Layer - Bottom Layer" at 6509.56,3774.94 h60
  text "Pad" at 8009.11,3774.94 h60
  text "Rounded" at 8598.96,3774.94 h60
  text "c50hn50" at 9688.64,3774.94 h60
  text "-" at 14199.33,3774.94 h60
  text "-" at 15289.02,3774.94 h60
  text "2" at 3520.38,3624.94 h60
  text "19.69mil (0.500mm)" at 4120.22,3624.94 h60
  text "PTH" at 5269.88,3624.94 h60
  text "Round" at 5775.76,3624.94 h60
  text "Top Layer - Bottom Layer" at 6509.56,3624.94 h60
  text "Via" at 8009.11,3624.94 h60
  text "Rounded" at 8598.96,3624.94 h60
  text "v70h50m0mx0" at 9688.64,3624.94 h60
  text "-" at 14199.33,3624.94 h60
  text "-" at 15289.02,3624.94 h60
  text "2" at 3520.38,3474.94 h60
  text "26.77mil (0.680mm)" at 4120.22,3474.94 h60
  text "PTH" at 5269.88,3474.94 h60
  text "Round" at 5775.76,3474.94 h60
  text "Top Layer - Bottom Layer" at 6509.56,3474.94 h60
  text "Pad" at 8009.11,3474.94 h60
  text "Rounded" at 8598.96,3474.94 h60
  text "c108h68" at 9688.64,3474.94 h60
  text "-" at 14199.33,3474.94 h60
  text "-" at 15289.02,3474.94 h60
  text "2" at 3520.38,3324.94 h60
  text "47.24mil (1.200mm)" at 4120.22,3324.94 h60
  text "NPTH" at 5269.88,3324.94 h60
  text "Slot" at 5775.76,3324.94 h60
  text "Top Layer - Bottom Layer" at 6509.56,3324.94 h60
  text "Pad" at 8009.11,3324.94 h60
  text "Rectangle" at 8598.96,3324.94 h60
  text "r40_100hn120_50" at 9688.64,3324.94 h60
  text "19.69mil (0.500mm)" at 14199.33,3324.94 h60
  text "-27.56mil (-0.700mm)" at 15289.02,3324.94 h60
  text "2" at 3520.38,3174.94 h60
  text "59.06mil (1.500mm)" at 4120.22,3174.94 h60
  text "PTH" at 5269.88,3174.94 h60
  text "Round" at 5775.76,3174.94 h60
  text "Top Layer - Bottom Layer" at 6509.56,3174.94 h60
  text "Pad" at 8009.11,3174.94 h60
  text "Rounded" at 8598.96,3174.94 h60
  text "c230h150m230p0" at 9688.64,3174.94 h60
  text "-" at 14199.33,3174.94 h60
  text "-" at 15289.02,3174.94 h60
  text "2" at 3520.38,3024.94 h60
  text "127.95mil (3.250mm)" at 4120.22,3024.94 h60
  text "NPTH" at 5269.88,3024.94 h60
  text "Round" at 5775.76,3024.94 h60
  text "Top Layer - Bottom Layer" at 6509.56,3024.94 h60
  text "Pad" at 8009.11,3024.94 h60
  text "Rounded" at 8598.96,3024.94 h60
  text "c325hn325m325p0" at 9688.64,3024.94 h60
  text "-" at 14199.33,3024.94 h60
  text "-" at 15289.02,3024.94 h60
  text "4" at 3520.38,2874.94 h60
  text "35.00mil (0.889mm)" at 4120.22,2874.94 h60
  text "PTH" at 5269.88,2874.94 h60
  text "Round" at 5775.76,2874.94 h60
  text "Top Layer - Bottom Layer" at 6509.56,2874.94 h60
  text "Pad" at 8009.11,2874.94 h60
  text "(Mixed)" at 8598.96,2874.94 h60
  text "(Mixed)" at 9688.64,2874.94 h60
  text "-" at 14199.33,2874.94 h60
  text "-" at 15289.02,2874.94 h60
  text "4" at 3520.38,2724.94 h60
  text "39.37mil (1.000mm)" at 4120.22,2724.94 h60
  text "PTH" at 5269.88,2724.94 h60
  text "Round" at 5775.76,2724.94 h60
  text "Top Layer - Bottom Layer" at 6509.56,2724.94 h60
  text "Pad" at 8009.11,2724.94 h60
  text "Rounded Rectangle" at 8598.96,2724.94 h60
  text "r100_200h100r25" at 9688.64,2724.94 h60
  text "-" at 14199.33,2724.94 h60
  text "-" at 15289.02,2724.94 h60
  text "4" at 3520.38,2574.94 h60
  text "40.16mil (1.020mm)" at 4120.22,2574.94 h60
  text "PTH" at 5269.88,2574.94 h60
  text "Round" at 5775.76,2574.94 h60
  text "Top Layer - Bottom Layer" at 6509.56,2574.94 h60
  text "Pad" at 8009.11,2574.94 h60
  text "(Mixed)" at 8598.96,2574.94 h60
  text "(Mixed)" at 9688.64,2574.94 h60
  text "-" at 14199.33,2574.94 h60
  text "-" at 15289.02,2574.94 h60
  text "7" at 3520.38,2424.94 h60
  text "11.81mil (0.300mm)" at 4120.22,2424.94 h60
  text "PTH" at 5269.88,2424.94 h60
  text "Round" at 5775.76,2424.94 h60
  text "Top Layer - Bottom Layer" at 6509.56,2424.94 h60
  text "Via" at 8009.11,2424.94 h60
  text "Rounded" at 8598.96,2424.94 h60
  text "(Mixed)" at 9688.64,2424.94 h60
  text "-" at 14199.33,2424.94 h60
  text "-" at 15289.02,2424.94 h60
  text "12" at 3520.38,2274.94 h60
  text "35.43mil (0.900mm)" at 4120.22,2274.94 h60
  text "PTH" at 5269.88,2274.94 h60
  text "Round" at 5775.76,2274.94 h60
  text "Top Layer - Bottom Layer" at 6509.56,2274.94 h60
  text "Pad" at 8009.11,2274.94 h60
  text "(Mixed)" at 8598.96,2274.94 h60
  text "(Mixed)" at 9688.64,2274.94 h60
  text "-" at 14199.33,2274.94 h60
  text "-" at 15289.02,2274.94 h60
  text "26" at 3520.38,2124.94 h60
  text "28.00mil (0.711mm)" at 4120.22,2124.94 h60
  text "PTH" at 5269.88,2124.94 h60
  text "Round" at 5775.76,2124.94 h60
  text "Top Layer - Bottom Layer" at 6509.56,2124.94 h60
  text "Pad" at 8009.11,2124.94 h60
  text "Rounded" at 8598.96,2124.94 h60
  text "(Mixed)" at 9688.64,2124.94 h60
  text "-" at 14199.33,2124.94 h60
  text "-" at 15289.02,2124.94 h60
  text "151" at 3520.38,1974.94 h60
  text "19.69mil (0.500mm)" at 4120.22,1974.94 h60
  text "PTH" at 5269.88,1974.94 h60
  text "Round" at 5775.76,1974.94 h60
  text "Top Layer - Bottom Layer" at 6509.56,1974.94 h60
  text "Via" at 8009.11,1974.94 h60
  text "Rounded" at 8598.96,1974.94 h60
  text "v70h50" at 9688.64,1974.94 h60
  text "-" at 14199.33,1974.94 h60
  text "-" at 15289.02,1974.94 h60
  text "222 Total" at 3520.38,1824.94 h60
  text "Slot definitions :" at 3014.5,1679.97 h60
  text "Routed Path Length" at 4047.19,1679.97 h60
  text "= Calculated from tool start centre position to tool end centre position." at 5149.86,1679.97 h60
  text "Hole Length" at 4047.19,1579.99 h60
  text "= Routed Path Length + Tool Size = Slot length as defined in the PCB layout" at 4739.99,1579.99 h60

## Dimensions
0,935.87 to 0,-0.01 on Mechanical 1
0.79,3126.77 to 0.79,2339.37 on Mechanical 1
0.79,2339.37 to 0,935.87 on Mechanical 1
0.79,2339.37 to 1235.04,2339.37 on Mechanical 1
2522.05,3126.77 to 2522.05,0 on Mechanical 1
0.79,3126.77 to 2522.05,3126.77 on Mechanical 1

## Text inside footprints (layer, text, board x,y; h text height)
J2: Mechanical 1 "J1" at 2319.4,375.08 h30 r180
J3: Mechanical 1 "J1" at 139.06,714 h30
P2: Mechanical 1 "J1" at 2271.61,379.29 h39.37